# Altium PCB Keyboard_V0.1.PcbDoc (part 2 of 4)
Units mil, origin at the board's own origin, x right, y up, seen from the top; angles counter-clockwise.
Board outline 5480.32 x 4193.11 mil, 2 copper layers (Top Layer, Bottom Layer); 162 components, 142 nets, 755 pads, 487 vias.
Unrouted connection lines stored in the file: 1.
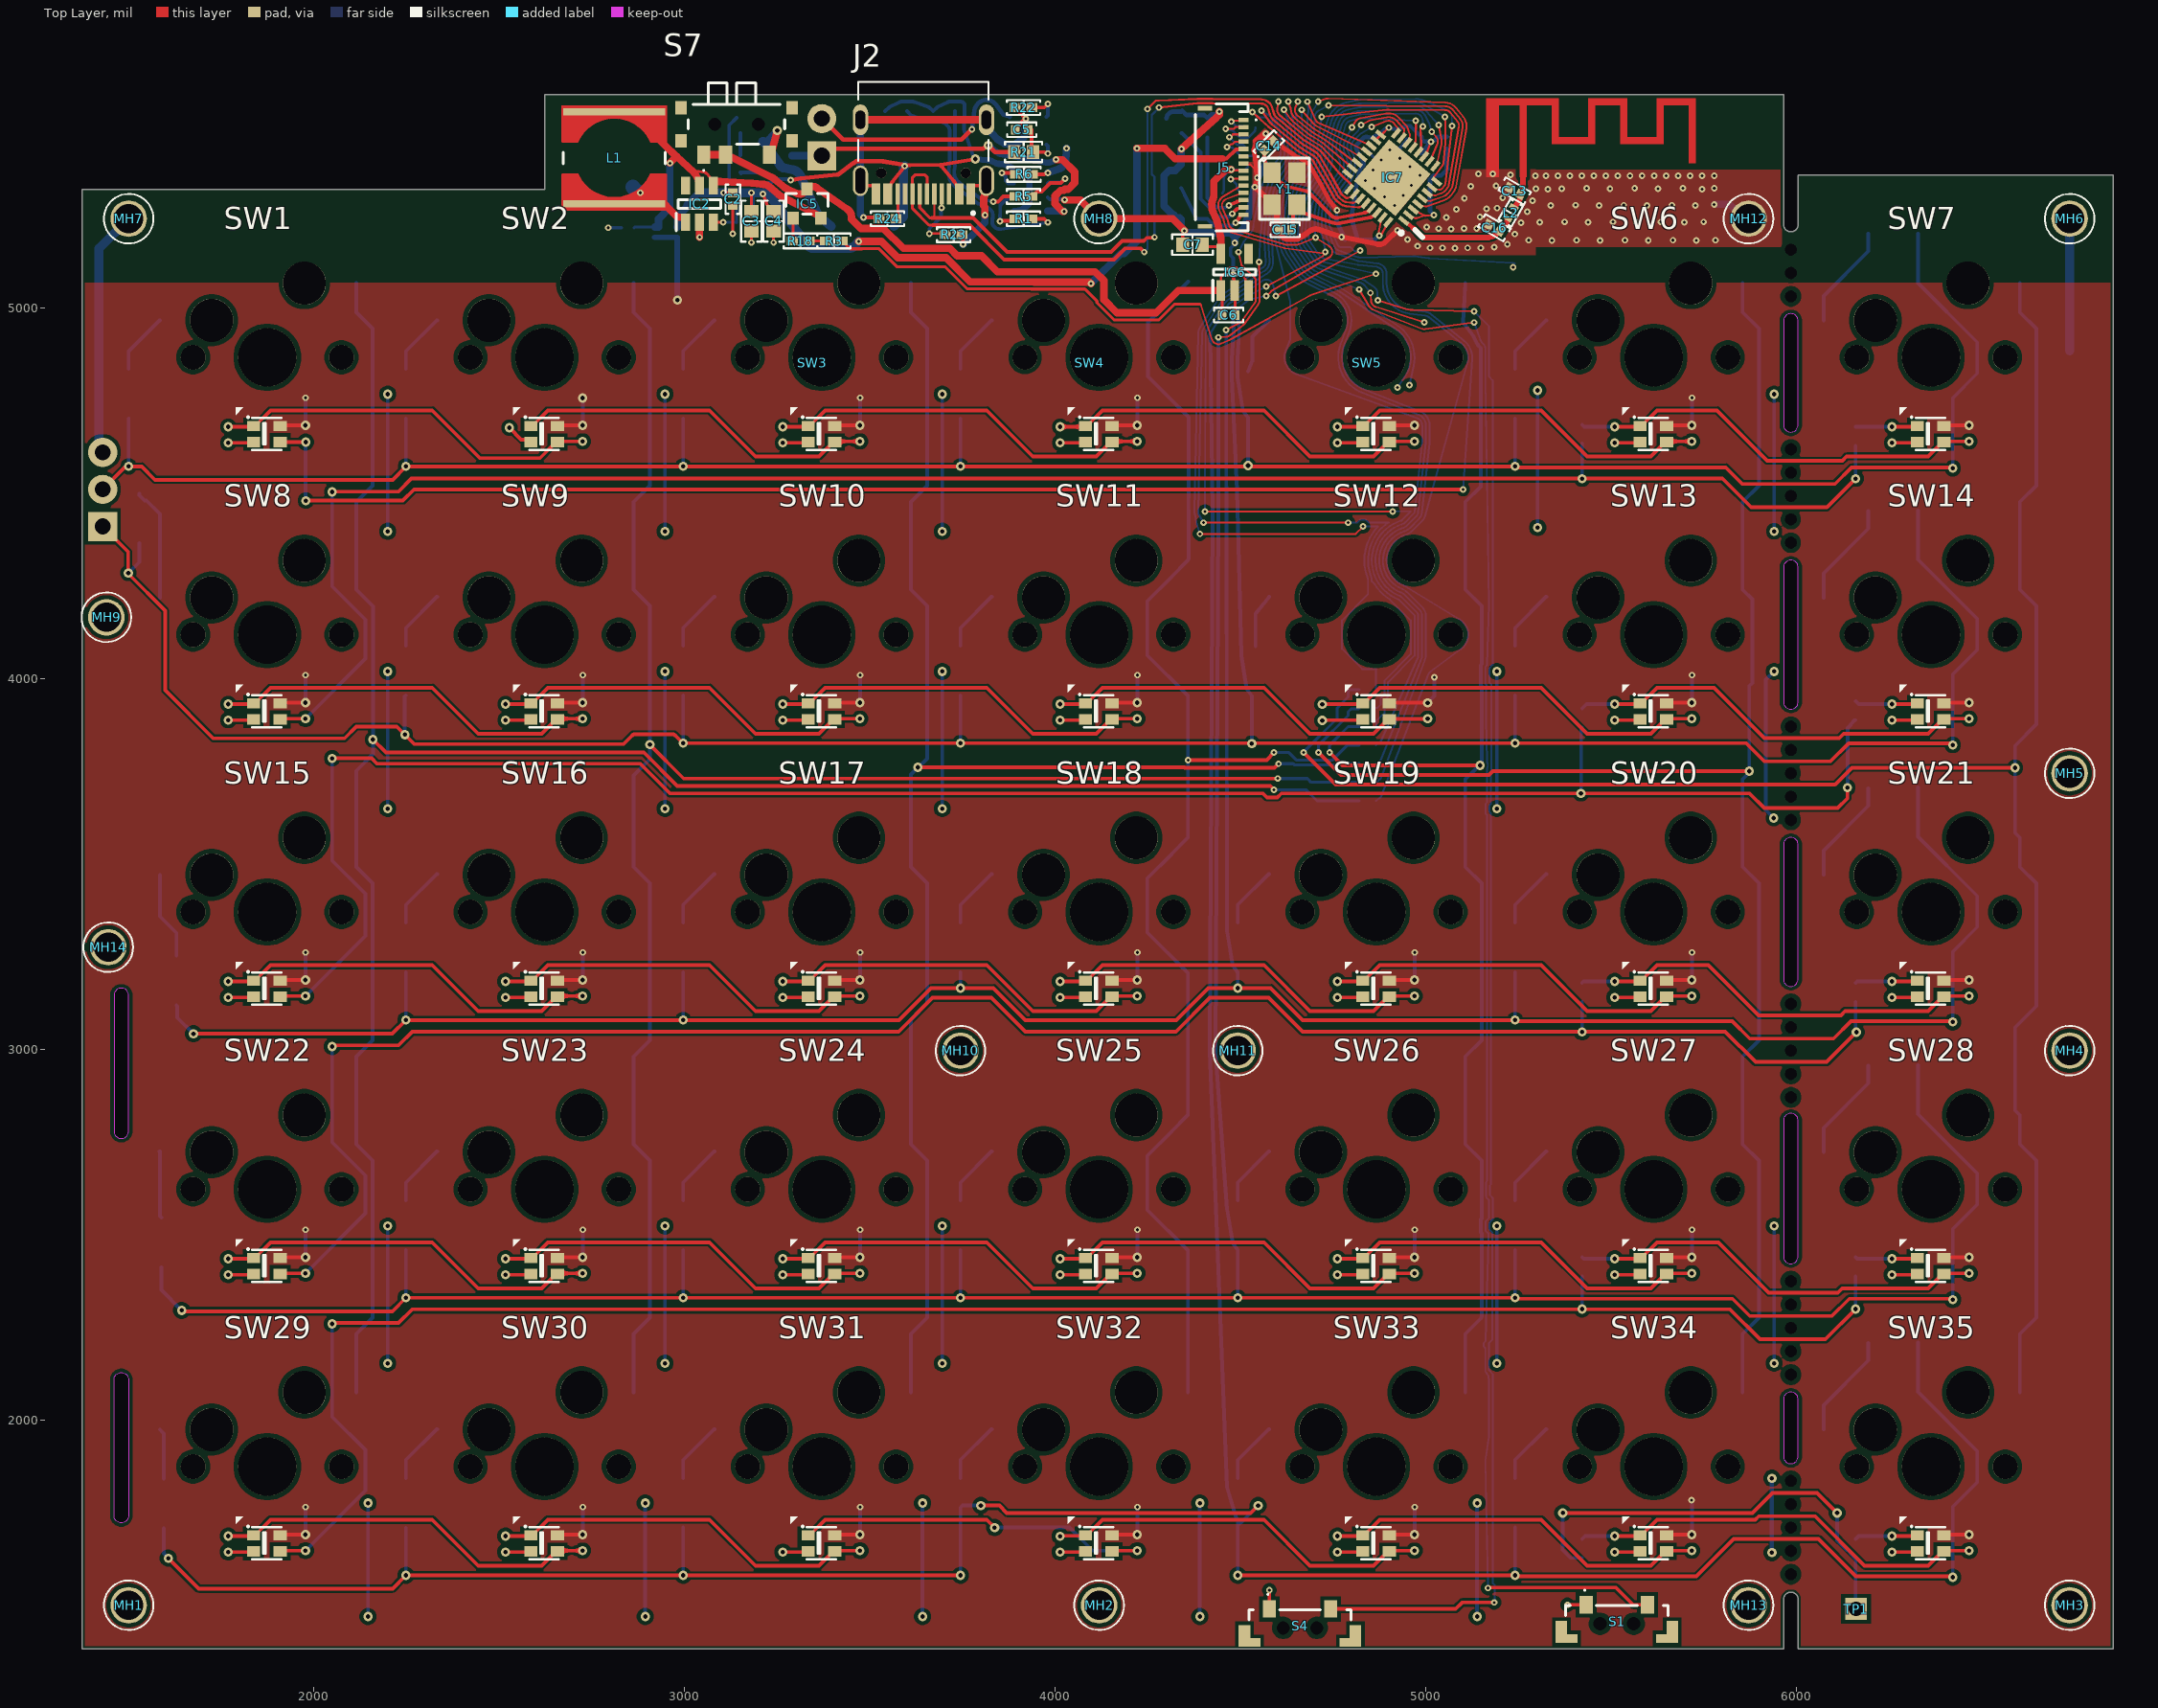
[diagram p0: Top Layer view]

## Via types
v1: diameter 25, hole 12, Top Layer to Bottom Layer, tented both sides, 244 vias
v2: diameter 17.72, hole 7.87, Top Layer to Bottom Layer, tented both sides, 242 vias
v3: diameter 17.72, hole 7.87, Top Layer to Bottom Layer, 1 vias

## Nets (pads, with @x,y where several pads share a name; then routed paths per layer and width w, separated by ;. In a path a pad name is that pad's centre, name@x,y a point inside that pad or via, vN(x,y) a via of type N, cw(c..) or ccw(c..) an arc to the next point about the centre after c; other vN are vias at no path point) (continued)
col1: (continued)
  Bottom Layer w10: v1@6588.9,3758.61 6588.9,3583.15 SW21.S2@6601.97,3570.08 6601.97,3491.96 6646.09,3447.84 6646.09,3116.09 6588.9,3058.9 6588.9,2835.11 SW28.S2@6601.97,2822.05 6601.97,2743.92 6646.09,2699.8 6646.09,2275.8 6601.97,2231.68 SW35.S2@6601.97,2074.01 ; v1(6588.9,3758.9) 6588.9,3818.9 6646.09,3876.09 6646.09,4195.87 6601.97,4239.99 SW14.S2@6601.97,4318.11 6601.97,4475.78 6646.09,4519.9 6646.09,4943.9 6601.97,4988.02 SW7.S2@6601.97,5066.14
col2: R30.1 SW6.S2 SW13.S2 SW20.S2 SW27.S2 SW34.S2 | length 4493.4
  Top Layer w10: v2(4710,3800) 4770,3740 5170,3740 5180,3750 5280,3750 5280.19,3749.81 v1(5871.99,3749.81)
  Bottom Layer w8: v2(4710,3800) 4710,3820 4790,3900 4790,3910 4797.92,3917.92 4817.92,3917.92 R30.1@4820,3920
  Bottom Layer w10: SW34.S2@5853.93,2074.01 5853.93,2231.68 5898.05,2275.8 5898.05,2699.8 5853.93,2743.92 SW27.S2@5853.93,2822.05 5853.93,2979.72 5898.05,3023.84 5898.05,3447.84 5853.93,3491.96 SW20.S2@5853.93,3570.08 5853.93,3727.75 5871.99,3745.81 v1(5871.99,3749.81) ; SW6.S2@5853.93,5066.14 5853.93,4988.02 5898.05,4943.9 5898.05,4519.9 5853.93,4475.78 SW13.S2@5853.93,4318.11 5853.93,4239.99 5880,4213.92 5880,3987.9 5871.99,3979.89 5871.99,3753.81 v1@5875.99,3749.81
col3: R31.1 SW5.S2 SW12.S2 SW19.S2 SW26.S2 SW33.S2 | length 3671.8
  Top Layer w10: v2(4740,3800) 4774.67,3765.33 v1(5146.02,3765.33)
  Bottom Layer w8: v2(4740,3800) 4740,3820 4790,3870 R31.1@4820,3870
  Bottom Layer w10: 5100.2,4963.6 ccw(c5110.19,4963.08) 5102.16,4957.12 5128.16,4922.45 5138.37,4902.6 ccw(c5147.24,4907.23) 5138.65,4902.11 cw(c5115.12,4887.87) 5139.87,4899.87 ccw(c5148.84,4904.29) 5141.72,4897.26 5147.09,4891.89 cw(c5146.16,4890.96) 5147.48,4890.96 5147.48,4517.35 5105.9,4475.78 SW12.S2@5105.9,4318.11 5105.9,4239.99 5150.02,4195.87 5150.02,4038.71 5147.5,4036.18 5147.5,3980.68 5150.02,3978.16 v1@5150.02,3771.87 ; 5100.2,4963.64 5103.44,5021.93 SW5.S2@5105.9,5066.14 ; SW33.S2@5105.9,2074.01 5105.9,2231.68 5147.22,2273 ccw(c5140.12,2280.04) 5150.01,2278.57 5150.02,2278.65 5150.02,2503.02 5148.02,2505.02 5148.02,2540.65 5150.02,2542.65 5150.02,2699.8 5105.9,2743.92 SW26.S2@5105.9,2822.05 5105.9,2979.72 5150.02,3023.84 5150.02,3447.84 5105.9,3491.96 SW19.S2@5105.9,3570.08 5105.9,3727.75 5143.49,3765.33 v1(5146.02,3765.33)
col4: R32.1 SW4.S2 SW11.S2 SW18.S2 SW25.S2 SW32.S2 | length 3853.2
  Top Layer w10: v2(4357.87,3780) 4570,3780 v2(4590,3800)
  Bottom Layer w8: v2(4590,3800) 4630,3800 4649.94,3780.06 4748.26,3780.06 4788.2,3820 R32.1@4820,3820
  Bottom Layer w10: SW32.S2@4357.87,2074.01 4357.87,2457.09 4248.03,2566.93 4248.03,2712.21 4312.68,2776.85 4312.68,2777.84 4356.89,2822.05 SW25.S2@4357.87,2822.05 4357.87,3205.12 4248.03,3314.96 4248.03,3460.24 4312.68,3524.88 4312.68,3525.87 4356.89,3570.08 SW18.S2@4357.87,3570.08 v2(4357.87,3780) 4357.87,3953.15 4248.03,4062.99 4248.03,4208.27 4312.68,4272.91 4312.68,4273.9 4356.89,4318.11 SW11.S2@4357.87,4318.11 ; SW4.S2@4358.78,5070 4314.57,5025.79 4314.57,5024.8 4249.92,4960.16 4249.92,4814.88 4359.76,4705.04 4359.76,4487.66 4359.06,4486.96 4359.06,4453.04 4359.76,4452.34 SW11.S2@4359.76,4321.97
col5: R33.1 SW3.S2 SW10.S2 SW17.S2 SW24.S2 SW31.S2 | length 4338.3
  Top Layer w10: v1(3628.9,3760.4) 4347.86,3760.4 4349.2,3759.06 4591.26,3759.06 v2(4602.06,3769.86)
  Bottom Layer w8: v2(4602.06,3769.86) 4641.76,3769.86 4644.55,3767.06 4753.64,3767.06 4756.58,3770 R33.1@4820,3770
  Bottom Layer w10: SW31.S2@3609.84,2074.01 3609.84,2231.68 3653.96,2275.8 3653.96,2699.8 3609.84,2743.92 SW24.S2@3609.84,2822.05 3609.84,3079.84 3653.96,3123.96 3653.96,3447.84 3609.84,3491.96 SW17.S2@3609.84,3570.08 3609.84,3740.95 3628.9,3760.01 v1(3628.9,3760.4) ; SW3.S2@3609.84,5066.14 3609.84,4988.02 3653.96,4943.9 3653.96,4519.9 3609.84,4475.78 SW10.S2@3609.84,4318.11 3609.84,4239.99 3653.96,4195.87 3653.96,3783.96 v1@3628.9,3758.9
col6: R34.1 SW2.S2 SW9.S2 SW16.S2 SW23.S2 SW30.S2 | length 5094.3
  Top Layer w10: v1(2906.13,3821.27) 2997.4,3730 v2(4600,3730)
  Bottom Layer w8: v2(4600,3730) 4679.96,3730 4689.96,3720 R34.1@4820,3720
  Bottom Layer w10: SW30.S2@2861.81,2074.01 2861.81,2231.68 2905.93,2275.8 2905.93,2699.8 2861.81,2743.92 SW23.S2@2861.81,2822.05 2861.81,2979.72 2905.93,3023.84 2905.93,3447.84 2861.81,3491.96 SW16.S2@2861.81,3570.08 2861.81,3738.09 2906.13,3782.41 v1(2906.13,3821.27) 2906.13,4195.66 2861.81,4239.99 SW9.S2@2861.81,4318.11 2861.81,4475.78 2905.93,4519.9 2905.93,4943.9 2861.81,4988.02 SW2.S2@2861.81,5066.14
col7: R35.1 SW1.S2 SW8.S2 SW15.S2 SW22.S2 SW29.S2 | length 5870.3
  Top Layer w10: v1(2158.9,3835.4) 2194.3,3800 2890,3800 2980,3710 4580,3710 v2(4590,3700)
  Bottom Layer w8: v2(4590,3700) 4675.69,3700 4705.69,3670 R35.1@4820,3670
  Bottom Layer w10: SW29.S2@2113.78,2074.01 2113.78,2231.68 2157.9,2275.8 2157.9,2699.8 2113.78,2743.92 SW22.S2@2113.78,2822.05 2113.78,2979.72 2157.9,3023.84 2157.9,3447.84 2113.78,3491.96 SW15.S2@2113.78,3570.08 2113.78,3750.57 2159.59,3796.39 v1@2159.59,3836.09 ; SW1.S2@2113.78,5066.14 2113.78,4988.02 2157.9,4943.9 2157.9,4519.9 2113.78,4475.78 SW8.S2@2113.78,4318.11 2113.78,4239.99 2159.59,4194.17 v1@2159.59,3836.09 ; v1(2158.9,3835.4) v1@2159.59,3836.09